# Altium PCB IndoorGuide_Tag_Device_V1.0.0.PcbDoc (part 2 of 2)
Units mil, origin at the board's own origin, x right, y up, seen from the top; angles counter-clockwise.
Board outline 2362.2 x 3661.42 mil, 4 copper layers (Top Layer, Ground, Power, Bottom Layer), stack 62.449 mil thick; 137 components, 86 nets, 438 pads, 206 vias.
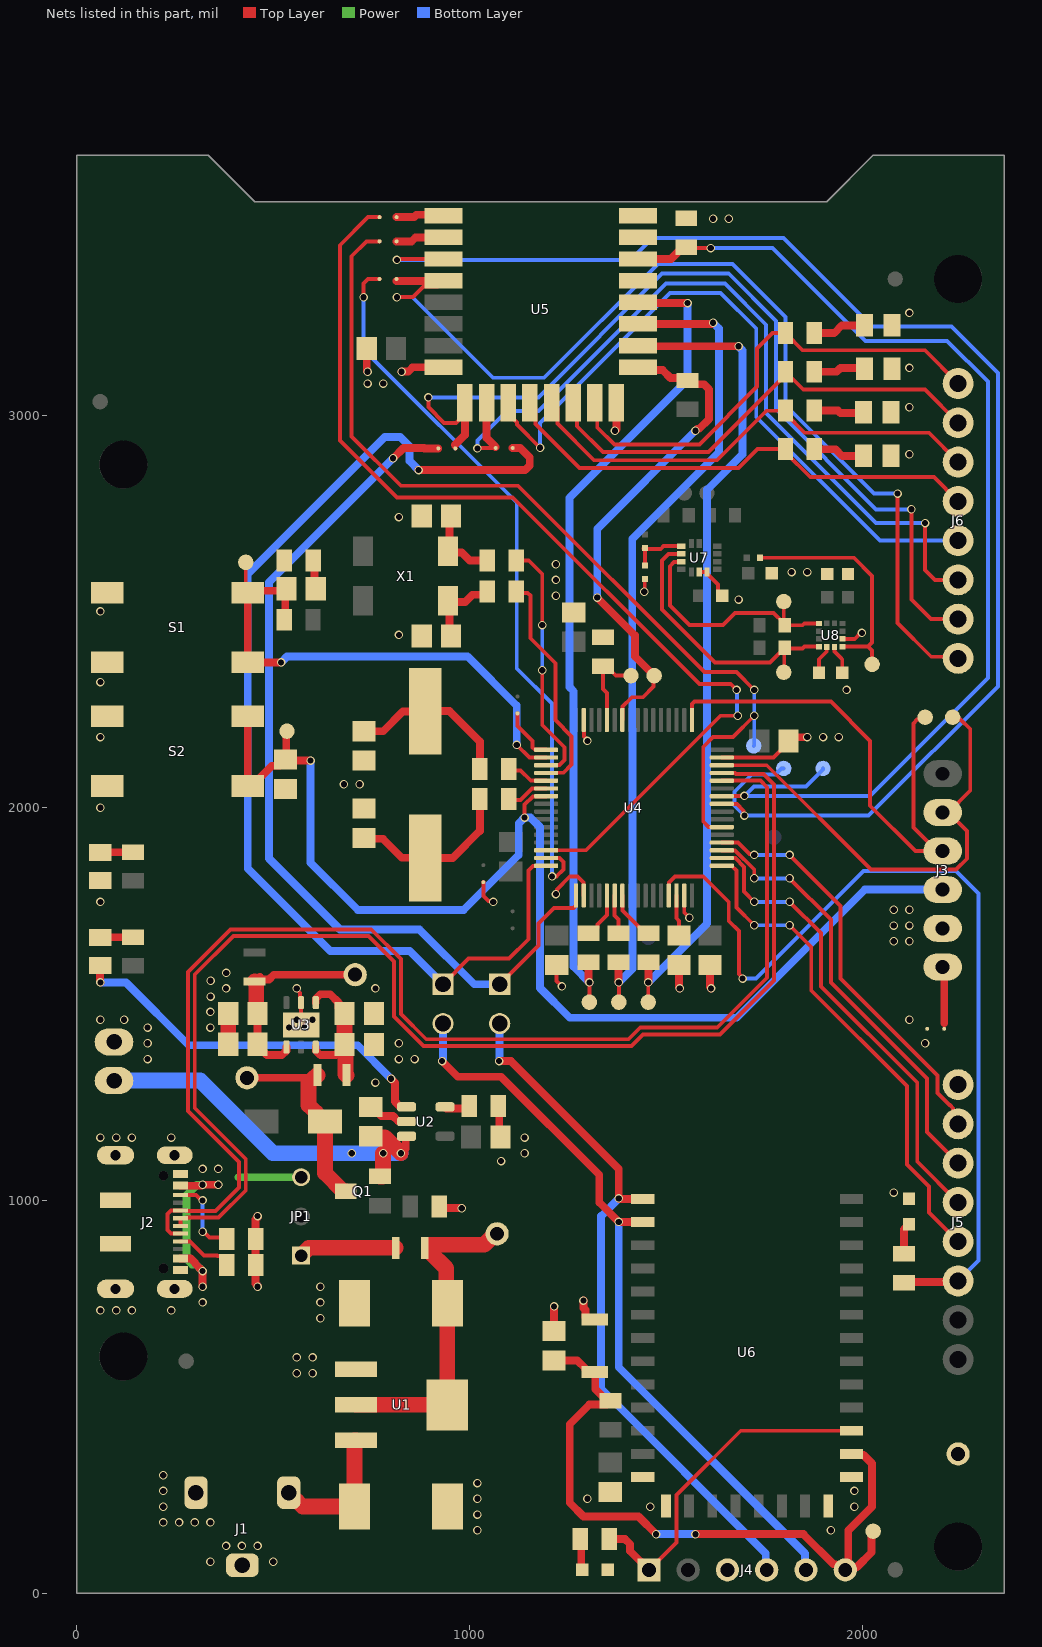
[diagram p4: the nets of this part, all layers, seen from the top]

## Via types
v1: diameter 21.65, hole 15.75, Top Layer to Bottom Layer, tented both sides, 206 vias

## Nets (pads, with @x,y where several pads share a name; then routed paths per layer and width w, separated by ;. In a path a pad name is that pad's centre, name@x,y a point inside that pad or via, vN(x,y) a via of type N, cw(c..) or ccw(c..) an arc to the next point about the centre after c; other vN are vias at no path point) (continued)
BLE_BRK: C23.1 J4.6 R24.1 S3.2 T20.1 U6.23 | length 1794.6
  Top Layer w20: C23.1@1214.65,592.52 1274.18,592.52 1295.43,571.27 1295.43,568.74 1301.18,562.99 S3.2@1318.9,562.99 1318.9,558.35 1320,557.24 1320,519.57 R24.1@1350,489.57 ; R24.1@1358.27,489.57 1348.58,479.88 1304.88,479.88 1255,430 1255,230 1290,195 1430,195 v1(1475,150) ; v1(1575,150) 1850,150 1926.73,73.27 1931.91,73.27 1938.65,66.53 J4.6@1957.49,66.53 ; J4.6@1956.69,59.06 J4.6@1964.17,66.53 ; U6.23@1972.44,354.33 1974.94,351.83 2003.17,351.83 2025,330 2025,220 1964.17,159.17 J4.6@1964.17,66.53 ; T20.1@2027.56,157.48 2023.85,153.77 2023.85,103.85 1986.53,66.53 J4.6@1964.17,66.53
  Bottom Layer w20: v1(1475,150) v1(1575,150)
BLE_RX: JP3.1 SB12.1 U4.16 | length 2857.5
  Top Layer w10: JP3.1@932.29,1550.31 997.69,1615.71 1100.66,1615.71 1150,1665.05 1150,1840 1161.76,1851.76 1194.53,1851.76 U4.16@1195.04,1852.27
  Top Layer w20: v1(870,2860) 1141.51,2860 1153.22,2871.72 1153.22,2891.78 1128.87,2916.13 SB12.1@1109.68,2916.13
  Bottom Layer w20: v1(870,2860) 847.25,2882.75 847.25,2919.96 823.28,2943.93 783.93,2943.93 435,2595 435,1845 645,1635 847.6,1635 JP3.1@932.29,1550.31
BLE_RX_CN: J4.5 JP3.2 U6.2 | length 1901
  Top Layer w20: v1@930.32,1354.68 970,1315 1080,1315 1330,1065 1330,995 v1(1380,945) 1380.12,944.88 U6.2@1440.94,944.88
  Bottom Layer w20: v1(930,1355) 930,1355.45 932.29,1357.74 JP3.2@932.29,1450.31 ; v1(1380,945) 1380,575 1854.23,100.77 1854.23,61.52 J4.5@1856.69,59.06
BLE_STATE: J4.1 R23.1 U6.24 | length 876.9
  Top Layer w10: J4.1@1456.69,59.06 1526.7,129.07 1526.7,249.52 1690.57,413.39 U6.24@1972.44,413.39
  Top Layer w20: R23.1@1355.71,137.8 1395.49,137.8 1408.88,124.4 1408.88,106.87 J4.1@1456.69,59.06
BLE_TX: JP2.1 SB11.1 U4.17 | length 2332.6
  Top Layer w10: JP2.1@1076.59,1550.31 1175,1648.71 1175,1705 1215,1745 1264.94,1745 1271.03,1751.09 U4.17@1271.03,1776.29
  Top Layer w20: v1(805,2890) 805.45,2890 831.58,2916.13 884.47,2916.13 885.6,2915 SB11.1@920.31,2915
  Bottom Layer w20: v1(805,2890) 489.17,2574.17 489.17,1870.83 670,1690 871.99,1690 1011.68,1550.31 JP2.1@1076.59,1550.31
BLE_TX_CN: J4.4 JP2.2 U6.1 | length 1790.5
  Top Layer w20: v1(1075,1355) 1105,1355 1380,1080 v1(1380,1005) 1381.06,1003.94 U6.1@1440.94,1003.94
  Bottom Layer w20: v1(1075,1355) 1075,1355.45 1076.59,1357.04 JP2.2@1076.59,1450.31 ; v1(1380,1005) 1335,960 1335,520 1754.23,100.77 1754.23,61.52 J4.4@1756.69,59.06
BOOT0: R14.2 T19.1 U4.60 | length 221.9
  Top Layer w10: U4.60@1349.77,2223.53 1349.77,2292.5 1339.93,2302.34 R14.2@1339.93,2360.28 1348.19,2360.28 1372.21,2336.26 T19.1@1411.06,2336.26
DEBUG_USB_D_N: J2.5 J2.8 U4.44 | length 3281.7
  Top Layer w10: J2.8@263.78,915.35 263.46,915.67 239.76,915.67 231.09,924.34 231.09,965.42 239.76,974.09 263.46,974.09 J2.5@263.78,974.41 278.15,974.41 279.41,973.15 353.15,973.15 412.84,1032.84 412.84,1097.89 282.84,1227.89 282.84,1582.05 391.18,1690.39 749.61,1690.39 825,1615 825,1475 889.66,1410.34 1404.86,1410.34 1434.52,1440 1630.73,1440 1757.84,1567.11 1757.84,2052.16 1741,2069 1642.48,2069 U4.44@1642.29,2068.81
DEBUG_USB_D_P: J2.6 J2.7 U4.45 | length 3245.3
  Top Layer w10: J2.7@263.78,935.04 J2.6@263.78,954.72 278.15,954.72 279.41,955.99 360.25,955.99 430,1025.73 430,1105 300,1235 300,1574.95 398.28,1673.23 742.5,1673.23 807.84,1607.89 807.84,1467.89 882.56,1393.18 1411.96,1393.18 1441.63,1422.84 1637.84,1422.84 1775,1560 1775,2059.27 1748.11,2086.16 1677.93,2086.16 1676.11,2087.98 1642.8,2087.98 U4.45@1642.29,2088.49
DW_CSn: R18.1 T11.1 U4.58 U5.17 | length 1276.2
  Top Layer w10: U4.58@1389.65,2224.04 1389.65,2257.35 1413.56,2281.26 1441.26,2281.26 1468.66,2308.66 1468.66,2334.8 T11.1@1470.12,2336.26
  Top Layer w20: v1(1325,2535) 1420.87,2439.13 1420.87,2385.51 T11.1@1470.12,2336.26 ; U5.17@1428.94,3121.85 1436.35,3114.44 1491.86,3114.44 1511.68,3094.62 1548.49,3094.62 R18.1@1555.12,3087.99 1564.8,3078.31 1596.69,3078.31 1610,3065 1610,2990 1585,2965 1580.45,2965 1575.45,2960 v1(1575,2960)
  Bottom Layer w20: v1(1325,2535) 1325,2710 v1(1575,2960)
DW_EXTON: SB8.1 U4.14 | length 2597.1
  Top Layer w10: SB8.1@770.66,3503.94 741.57,3503.94 670,3432.37 670,2935 814.92,2790.08 1109.92,2790.08 1585,2315 1665,2315 v1(1680,2300) ; U4.14@1195.04,1891.64 1296.64,1891.64 1639.17,2234.17 v1(1682.67,2234.17)
  Bottom Layer w10: v1(1680,2300) 1681.34,2298.66 1681.34,2235.51 v1(1682.67,2234.17)
DW_GPIO0: J6.1 R19.2 U5.15 | length 1230.1
  Top Layer w10: U5.15@1318.9,3031.5 1325,3025.39 1325,2968.48 1368.48,2925 1585,2925 1732.28,3072.28 1732.28,3169.29 1771.65,3208.66 R19.2@1804.53,3208.66 1848.19,3165 2159.41,3165 J6.1@2244.09,3080.32
DW_GPIO0/RXOKLED: D4.1 R19.1 | length 135.1
  Top Layer w20: R19.1@1878.15,3208.66 1928.35,3208.66 1948.03,3228.35 D4.1@2005.08,3228.35
DW_GPIO1: J6.2 R20.2 U5.14 | length 1205.3
  Top Layer w10: U5.14@1263.78,3031.5 1273.46,3021.81 1273.46,2971.54 1339.33,2905.67 1608.23,2905.67 1804.53,3101.97 R20.2@1804.53,3110.24 1849.76,3065 2159.41,3065 J6.2@2244.09,2980.32
DW_GPIO1/SFDLED: D5.1 R20.1 | length 131.8
  Top Layer w20: R20.1@1878.15,3110.24 1934.61,3110.24 1944.37,3120 2003.02,3120 D5.1@2005.08,3117.94
DW_GPIO2: J6.3 R21.2 U5.13 | length 1230.4
  Top Layer w10: U5.13@1208.66,3031.5 1223.35,3016.81 1223.35,2978.56 1316.91,2885 1630,2885 1756.02,3011.02 1803.73,3011.02 R21.2@1804.53,3011.81 1804.53,3003.54 1853.07,2955 2169.41,2955 J6.3@2244.09,2880.32
DW_GPIO2/RXLED: D6.1 R21.1 | length 128.2
  Top Layer w20: R21.1@1878.15,3011.81 1937.87,3011.81 1944.37,3005.31 2000.53,3005.31 D6.1@2002.76,3007.54
DW_GPIO3: J6.4 R22.2 U5.12 | length 1262.7
  Top Layer w10: U5.12@1153.54,3031.5 1168.23,3016.81 1168.23,2976.77 1280,2865 1685,2865 1733.07,2913.07 R22.2@1804.53,2913.07 1804.53,2904.8 1867.54,2841.79 2182.62,2841.79 J6.4@2244.09,2780.32
DW_GPIO3/TXLED: D7.1 R22.1 | length 132.6
  Top Layer w20: R22.1@1878.15,2913.07 1931.61,2913.07 1949.37,2895.32 2001.25,2895.32 D7.1@2002.76,2896.82
DW_GPIO4: J6.5 U5.11 | length 1805.9
  Top Layer w10: U5.11@1098.43,3031.5 1098.43,3002.95 1120.86,2980.52 1120.86,2975.56 v1(1179.66,2916.75)
  Bottom Layer w10: v1(1179.66,2916.75) 1179.66,2979.66 1510.83,3310.83 1639.17,3310.83 1730,3220 1730,2995 2044.69,2680.32 J6.5@2244.09,2680.32
DW_GPIO5: J6.6 SB12.2 U5.10 | length 2093.3
  Top Layer w10: v1(1020,2915) 1021.13,2916.13 SB12.2@1066.38,2916.13 ; v1(2160,2725) 2160,2605 2184.69,2580.32 J6.6@2244.09,2580.32
  Top Layer w20: U5.10@1043.31,3031.5 1043.31,2941.69 SB12.2@1066.06,2918.94
  Bottom Layer w10: v1(1020,2915) 1020,2935 1095,3010 1175,3010 1500,3335 1650,3335 1755,3230 1755,3005 2035,2725 v1(2160,2725)
DW_GPIO6: J6.7 SB11.2 U5.9 | length 2380.6
  Top Layer w10: v1(895,3045) 895,3020 935,2980 965.24,2980 988.19,3002.95 U5.9@988.19,3031.5 ; 958.94,2921.21 958.94,2919.68 SB11.2@963.62,2915 ; v1(2125,2760) 2125,2530 2174.69,2480.32 J6.7@2244.09,2480.32
  Top Layer w20: 962.92,2924.3 988.19,2949.57 U5.9@988.19,3002.95
  Bottom Layer w10: v1(895,3045) 1175,3045 1490,3360 1660,3360 1780,3240 1780,3015 2035,2760 v1(2125,2760)
DW_GPIO7: J6.8 SB10.2 U5.4 | length 2634.6
  Top Layer w10: 813.97,3341.4 SB10.2@813.97,3346.46 ; v1(815,3300) 815.55,3300.55 855.55,3300.55 882.64,3327.64 918.58,3327.64 932.34,3341.4 U5.4@933.27,3342.32 ; v1(2090,2800) 2090,2470 2175.58,2384.42 2239.99,2384.42 J6.8@2244.09,2380.32
  Top Layer w20: 813.97,3341.4 U5.4@932.34,3341.4
  Bottom Layer w10: v1(815,3300) 855,3300 1060,3095 1190,3095 1480,3385 1670,3385 1805,3250 1805,3025 2030,2800 v1(2090,2800)
DW_GPIO7/SYNC: SB10.1 U4.15 | length 1857
  Top Layer w10: v1(730,3300) 730,3335 741.46,3346.46 SB10.1@770.66,3346.46 ; U4.15@1195.04,1871.95 1195.56,1871.44 1228.86,1871.44 1238.75,1861.55 1238.75,1842.99 1220.76,1825 v1(1210,1825)
  Bottom Layer w10: v1(730,3300) 730,3167 1120,2777 1120,2355 1210,2265 v1(1210,1825)
DW_IRQn: R17.2 T14.1 U4.42 U5.22 | length 2833.5
  Top Layer w10: R17.2@1551.71,3427.76 1554.27,3425.2 v1(1614.17,3425.2) ; U4.42@1642.29,2029.44 1699.44,2029.44 v1(1700,2030)
  Top Layer w20: U5.22@1428.94,3397.44 1513.13,3397.44 1543.44,3427.76 R17.2@1551.71,3427.76
  Bottom Layer w10: v1(1614.17,3425.2) 1771.65,3425.2 2007.87,3188.98 2216.02,3188.98 2320,3085 2320,2330 2020,2030 v1(1700,2030) 1723.81,2053.81 1856.76,2053.81 1900,2097.06 T14.1@1900,2100
DW_MISO: R8.2 T9.1 U5.19 | length 2086.6
  Top Layer w10: T9.1@1380,1505 v1(1380,1555)
  Top Layer w20: R8.2@1379.3,1606.54 1379.3,1555.7 v1(1380,1555) ; U5.19@1428.94,3232.09 1616.64,3232.09 1619.55,3235 v1(1620,3235)
  Bottom Layer w20: v1(1380,1555) 1415,1590 1415,2199.17 1414.17,2200 1414.17,2684.17 1635,2905 1635,3220 v1(1620,3235)
DW_MOSI: R9.2 T10.1 U5.18 | length 2082.3
  Top Layer w10: T10.1@1455,1505 v1(1455,1555)
  Top Layer w20: U5.18@1428.94,3176.97 1430.59,3175.32 1684.68,3175.32 v1(1685,3175) ; v1(1455,1555) 1455.7,1555.7 R9.2@1455.7,1606.54
  Bottom Layer w20: v1(1455,1555) 1605,1705 1605,2810 1695,2900 1695,3164.55 1685,3174.55 v1(1685,3175)
DW_RESETn: T13.1 U4.41 U5.3 | length 3692.3
  Top Layer w10: v1(815,3395) 818.15,3395 820.59,3397.44 U5.3@933.27,3397.44 ; U4.41@1642.29,2009.75 1642.8,2009.24 1680.76,2009.24 1697.77,1992.23 1697.77,1982.23 v1(1700,1980)
  Bottom Layer w10: v1(815,3395) 1410,3395 1466.02,3451.02 1798.98,3451.02 2025,3225 2227.16,3225 2345.21,3106.96 2345.21,2308.96 2016.24,1980 v1(1700,1980) 1674.17,2005.83 1674.17,2040.7 1718.48,2085 1779.46,2085 1794.46,2100 T13.1@1800,2100
DW_SCK: R7.2 T8.1 U5.20 | length 2105.1
  Top Layer w10: T8.1@1305,1505 v1(1305,1555)
  Top Layer w20: R7.2@1302.89,1606.54 1302.89,1557.56 1305,1555.45 v1(1305,1555) ; U5.20@1428.94,3287.2 1430.83,3285.32 1554.68,3285.32 v1(1555,3285)
  Bottom Layer w20: v1(1305,1555) 1265,1595 1265,2296.4 1254.17,2307.23 1254.17,2789.17 1555,3090 v1(1555,3285)
DW_WAKEUP: SB9.1 T18.1 U4.38 | length 2387.9
  Top Layer w10: SB9.1@770.66,3442.35 737.35,3442.35 699.5,3404.5 699.5,2945.5 825,2820 1123.48,2820 1598.32,2345.15 1679.85,2345.15 v1(1725,2300) ; U4.38@1642.29,1950.7 1641.78,1951.21 1608.47,1951.21 1595,1964.68 1595,2155 1620,2180 1670.83,2180 v1(1725,2234.17)
  Bottom Layer w10: T18.1@1723.59,2157.62 1725,2159.02 v1(1725,2234.17) v1(1725,2300)
EXT_5V: JP1.1 SB1.2 | length 249.6
  Top Layer w40: JP1.1@570.87,859.11 590.9,879.15 SB1.2@812.2,879.15
GND: B1.2 C1.2 C2.2 C3.1 C4.1 C5.1 C6.1 C7.1 C8.1 C9.1 C10.1 C11.1 C12.1 C15.1 C16.1 C17.1 C18.1 C19.1 C20.1 C21.2 C22.1 C23.2 C24.2 C25.2 C26.2 C27.2 C28.1 D3.2 D4.2 D5.2 D6.2 D7.2 D8.2 D9.2 J1.2 J1.3 J2.1 J2.12 J2.S1 J2.S2 J2.S3 J2.S4 J2.S5 J2.S6 J3.5 J4.3 J5.8 R2.1 R3.1 R5.1 R6.1 R11.2 R14.1 R17.1 S1.1 S1.4 S2.2 S2.3 S3.1 SB4.1 SB7.1 SB14.2 T24.1 U1.1 U2.2 U3.2 U3.7 U4.18 U4.31 U4.47 U4.63 U5.8 U5.16 U5.21 U5.23 U5.24 U6.13 U6.14 U6.21 U6.22 U7.6 U7.7 U8.6 U8.8 | length 1995.5
  Top Layer w10: v1(560,1540) 560,1536.85 567.99,1528.85 567.99,1506.45 U3.2@570.87,1503.57 U3.7@570.87,1447.08 ; SB7.1@1035,1810.32 1035,1775 1047.77,1762.23 1057.77,1762.23 v1(1060,1760) ; v1(1220,1780) 1222.23,1782.23 1222.23,1792.23 1255,1825 1275.3,1825 1290.2,1810.1 1290.2,1776.8 U4.18@1290.71,1776.29 ; C9.1@1221.82,1599.46 1221.82,1558.87 1235,1545.68 v1(1235,1545) ; U4.63@1290.71,2223.53 1291.22,2223.02 1291.22,2181.93 1300,2173.15 v1(1300,2170) ; v1(1445,2550) 1446,2551 1446,2581.49 SB14.2@1447.01,2582.49 ; U4.31@1546.62,1776.29 1546.62,1733.38 v1(1560,1720) ; U7.6@1584.8,2600.61 U7.7@1604.49,2600.61 1604.49,2596.18 1613.45,2587.22 1613.76,2587.22 1632.95,2568.03 1632.95,2550.12 C26.2@1643.7,2539.37 ; U4.47@1642.29,2127.86 1706.24,2127.86 1706.62,2127.47 1773.81,2127.47 1812.4,2166.06 C11.1@1812.4,2170 C11.1@1817.4,2165 ; U8.6@1929.29,2409.67 1929.29,2397.68 1946.05,2380.92 1948.98,2377.99 C28.1@1948.98,2343.52 ; U8.8@1949.47,2429.84 1980.86,2429.84 1996.02,2445 v1(1999.17,2445)
  Top Layer w20: v1(460,780) 460,783.15 454.88,788.27 R5.1@454.88,835.05 R6.1@454.88,901.46 454.88,951.73 460,956.85 v1(460,960) ; C21.2@738.09,3169.29 738.09,3112.36 v1(740,3110.45) ; C4.1@748.03,1238.19 751.97,1238.19 775.16,1215 804.89,1215 817.29,1202.6 837.71,1202.6 U2.2@839.52,1200.79 ; v1(826.77,3110.24) 827.09,3110.55 843.74,3110.55 855.04,3121.85 U5.8@933.27,3121.85 ; R3.1@922.64,984.25 926.57,980.32 979.68,980.32 v1(980,980) ; R2.1@1072.83,1240.16 1075.52,1237.47 1075.52,1164.1 C3.1@1078.2,1161.42 ; C23.2@1214.65,667.32 1214.65,729.65 v1(1215,730) ; v1(1290,745) 1290.16,744.84 1290.16,726.03 1295.43,720.75 1295.43,702.6 1300.96,697.07 S3.1@1319.12,697.07 ; v1(1370,2960) 1374.02,2964.02 U5.16@1374.02,3031.5 ; C16.1@1533.1,1599.46 1533.1,1542.88 1535,1540.98 v1(1535,1540) ; C10.1@1611.84,1599.46 1611.84,1544.14 1615,1540.98 v1(1615,1540) ; C11.1@1817.4,2165 1827.99,2175.59 1827.99,2179.31 1859.31,2179.31 v1(1860,2180)
  Top Layer w40: C5.1@385.38,1397.78 C6.1@385.38,1476.18
  other v1: 340,80 500,80 380,120 420,120 460,120 1020,160 1920,160 220,180 260,180 300,180 340,180 1020,200 220,220 1460,220 1980,220 1020,240 1300,240 220,260 1980,260 1020,280 220,300 560,560 600,560 560,600 600,600 620,700 60,720 100,720 140,720 240,720 620,740 620,780 2080,1020 1080,1100 1140,1120 60,1160 100,1160 140,1160 240,1160 1140,1160 760,1300 180,1360 820,1360 860,1360 180,1400 820,1400 2160,1400 180,1440 340,1440 540,1440 580,1440 60,1460 120,1460 560,1460 600,1460 2120,1460 340,1480 340.19,1519.17 380,1540 760,1540 340.19,1559.17 380.19,1579.17 2080,1660 2120,1660 2080,1700 2120,1700 2080,1740 2120,1740 60,1760 60,2000 680,2060 720,2060 60,2180 1900,2180 1940,2180 1960,2300 60,2320 820,2440 60,2500 1685,2530 1220,2540 1220,2580 1820,2600 1860,2600 1220,2620 820,2740 2120,2900 2120,3020 740,3080 780,3080 2120,3120 2120,3260 1620,3500 1660,3500
MAG_SCL: R26.1 T22.1 U7.3 U8.1 | length 618.9
  Top Layer w10: U7.3@1539.04,2626.69 1538.24,2625.9 1520.9,2625.9 1510,2615 1510,2515 1560,2465 1645,2465 1675.93,2495.93 1774.05,2495.93 R26.1@1800,2469.98 ; T22.1@1800,2525 1800,2467.23 R26.1@1802.6,2464.63 1847.7,2464.63 1852.49,2469.42 1889.13,2469.42 U8.1@1889.72,2470
MAG_SDA: R27.1 T23.1 U7.2 U8.4 | length 713.7
  Top Layer w10: U7.2@1539.04,2646.38 1506.38,2646.38 1490,2630 1490,2505 1625,2370 1765.32,2370 1789.29,2393.98 1792.05,2393.98 R27.1@1801.34,2403.27 ; T23.1@1800,2345 1801.34,2346.34 R27.1@1801.34,2403.27 ; R27.1@1802.6,2407.28 1801.34,2406.02 R27.1@1801.34,2403.27 ; R27.1@1803.07,2405 1847.52,2405 1852.68,2410.16 U8.4@1889.43,2410.16
MCU_GPIO1: J5.3 R25.2 U4.29 | length 2315.6
  Top Layer w10: U4.29@1507.25,1776.29 1507.76,1776.8 1507.76,1810.1 1522.66,1825 1595,1825 1660,1760 1660,1711.52 1685.83,1685.7 1685.83,1576.68 1695,1567.51 v1(1695,1565)
  Top Layer w20: R25.2@2106.3,789.96 2108.76,792.42 2241.63,792.42 J5.3@2244.09,794.88
  Bottom Layer w10: v1(1695,1565) 1728.84,1565 2002.62,1838.79 2239.14,1838.79 2296.46,1781.46 2296.46,847.25 J5.3@2244.09,794.88
MCU_GPIO2: J5.4 U4.33 | length 1274.1
  Top Layer w10: U4.33@1642.29,1852.27 1667.48,1852.27 1680,1839.75 1680,1745.65 v1(1725,1700.65) ; v1(1815,1700.65) 1870,1645.65 1870,1535 2113.58,1291.42 2113.58,1091.42 2170,1035 2170,968.98 J5.4@2244.09,894.88
  Bottom Layer w10: v1(1725,1700.65) v1(1815,1700.65)
MCU_GPIO3: J5.5 U4.34 | length 1198.9
  Top Layer w10: U4.34@1642.29,1871.95 1642.8,1871.44 1676.7,1871.44 1699.17,1848.97 1699.17,1786.26 v1(1725,1760.43) ; v1(1815,1760.43) 1894.78,1680.65 1894.78,1545.22 2140,1300 2140,1098.98 J5.5@2244.09,994.88
  Bottom Layer w10: v1(1725,1760.43) v1(1815,1760.43)
MCU_GPIO4: J5.6 U4.35 | length 1118.3
  Top Layer w10: U4.35@1642.29,1891.64 1642.8,1891.13 1676.11,1891.13 1725,1842.23 v1(1725,1820.22) ; v1(1815,1820.22) 1920,1715.22 1920,1555 2165,1310 2165,1173.98 J5.6@2244.09,1094.88
  Bottom Layer w10: v1(1725,1820.22) v1(1815,1820.22)
MCU_GPIO5: J5.7 U4.36 | length 1049
  Top Layer w10: U4.36@1642.29,1911.33 1683.47,1911.33 1712.56,1882.23 1722.77,1882.23 v1(1725,1880) ; v1(1815,1880) 1945,1750 1945,1565 2191.72,1318.28 2191.72,1273.19 2222.4,1242.51 2223.12,1242.51 2230.94,1234.69 2230.94,1208.03 J5.7@2244.09,1194.88
  Bottom Layer w10: v1(1725,1880) v1(1815,1880)
MDRDY: SB15.2 T21.1 U8.7 | length 603.7
  Top Layer w10: SB15.2@1739.61,2636.57 1978.43,2636.57 2025,2590 2025,2420.32 2014.84,2410.16 ; U8.7@1949.63,2410 U8.7@1949.47,2410.16 1958.27,2410.16 2014.84,2410.16 ; T21.1@2025,2365 2025,2400 2014.84,2410.16
NetB1_1: B1.1 C4.2 Q1.2 U2.3 | length 1017.5
  Top Layer w20: v1(825,1120) 837.3,1132.3 837.3,1161.57 837.71,1161.57 U2.3@839.52,1163.39
  Top Layer w40: C4.2@748.03,1161.18 750.24,1161.18 750.59,1160.83 784.17,1160.83 v1(825,1120) ; Q1.2@771.65,1061.02 778.9,1061.02 779.21,1061.34 779.21,1119.21 v1(780,1120)
  Bottom Layer w40: B1.1@94.49,1305.12 314.25,1305.12 499.37,1120 v1(700,1120) v1(780,1120) v1(825,1120)
NetC1_1: C1.1 J1.1 U1.3 | length 361.2
  Top Layer w40: J1.1@539.37,255.91 539.37,244.09 548.9,234.57 560.71,234.57 574.84,220.43 C1.1@707.13,220.43 707.13,388.59 707.44,388.91 U1.3@710.63,388.91
NetC2_1: C2.1 SB1.1 T1.1 U1.2 U1.4 | length 845.3
  Top Layer w40: U1.2@710.63,479.46 U1.4@942.91,479.46 943.13,479.68 943.13,738.27 C2.1@943.35,738.48 940.24,741.59 940.24,826.94 895.98,871.2 895.98,887.1 1037.04,887.1 1064.94,915 T1.1@1070,915
NetC5_2: C5.2 C6.2 SB3.1 T3.1 U3.4 | length 531.8
  Top Layer w20: SB3.1@452.76,1557.68 454.84,1557.68 465.65,1568.49 466.47,1568.49 472.47,1562.49 489.04,1562.49 501.36,1574.8 T3.1@708.66,1574.8 ; C6.2@460.18,1476.18 C5.2@460.18,1397.78 460.18,1393.84 484.02,1370 521.75,1370 533.46,1381.72 U3.4@533.46,1390.58
  Top Layer w40: SB3.1@452.76,1557.68 456.47,1553.97 456.47,1479.9 C6.2@460.18,1476.18
NetC14_2: C14.2 R11.1 | length 75.2
  Top Layer w20: R11.1@601.81,2630 605.04,2626.77 605.04,2560.71 C14.2@608.27,2557.48
NetC16_2: C16.2 U4.30 | length 105
  Top Layer w10: U4.30@1526.93,1776.29 1526.42,1775.77 1526.42,1718.58 1533.1,1711.9 C16.2@1533.1,1674.26
NetC17_2: C17.2 R13.1 X1.1 | length 202.9
  Top Layer w20: C17.2@952.95,2742.55 949.02,2738.62 949.02,2657.01 X1.1@945.08,2653.07 948.15,2650 980,2650 1000.55,2629.45 R13.1@1045.44,2629.45
NetC18_2: C18.2 R12.2 X1.4 | length 200.6
  Top Layer w20: X1.4@945.08,2527.09 X1.4@949.02,2523.15 ; C18.2@952.95,2437.6 949.02,2441.54 X1.4@949.02,2523.15 ; R12.2@1045.44,2550.71 1037.19,2542.47 1007.47,2542.47 988.95,2523.95 949.82,2523.95 X1.4@949.02,2523.15
NetC19_2: C19.2 R15.2 X2.1 | length 425.5
  Top Layer w20: C19.2@731.3,1923.14 733.55,1920.89 779.11,1920.89 827.55,1872.45 886.67,1872.45 X2.1@887.17,1871.95 956.95,1871.95 1026.18,1941.18 R15.2@1026.18,2021.93
NetC20_2: C20.2 R16.2 X2.2 | length 418.5
  Top Layer w20: C20.2@731.3,2194.79 779.79,2194.79 830,2245 886.2,2245 X2.2@887.17,2245.97 949.03,2245.97 1026.18,2168.82 R16.2@1026.18,2098.33
NetC28_2: C28.2 U8.5 | length 74.3
  Top Layer w10: C28.2@1889.92,2343.52 1890,2343.6 1890,2378.07 1909.61,2397.68 U8.5@1909.61,2409.67
NetD1_2: D1.2 Q1.3 SB2.1 T2.1 | length 528
  Top Layer w20: T2.1@433.07,1312.24 603.93,1312.24 SB2.1@610.59,1318.9
  Top Layer w40: SB2.1@603.93,1312.24 590,1298.31 590,1242.68 608.58,1224.09 608.58,1211.3 619.09,1200.79 D1.2@631.89,1200.79 631.89,1069.53 677.8,1023.62 Q1.3@685.04,1023.62 ; SB2.1@610.59,1318.9 SB2.1@612.8,1318.9
NetD2_1: D2.1 R1.1 | length 84.1
  Top Layer w20: D2.1@59.06,1669.29 59.74,1669.98 141.93,1669.98 R1.1@142.62,1670.67
NetD2_2: D2.2 U2.1 | length 982.9
  Top Layer w20: D2.2@59.06,1598.43 59.06,1555.94 v1(60,1555) ; v1(800,1310) 800,1309.55 810,1299.55 810,1251.72 821.72,1240 837.71,1240 U2.1@839.52,1238.19
  Bottom Layer w20: v1(60,1555) 125,1555 285,1395 715,1395 v1(800,1310)
NetD3_1: D3.1 R4.1 | length 84.1
  Top Layer w20: D3.1@59.06,1885.83 59.74,1886.52 141.93,1886.52 R4.1@142.62,1887.2
NetD8_1: D8.1 R23.2 | length 80.5
  Top Layer w20: R23.2@1282.09,137.8 1284.25,135.63 1284.25,61.22 D8.1@1286.42,59.06
NetD9_1: D9.1 R25.1 | length 80.7
  Top Layer w20: R25.1@2106.3,863.58 2106.3,926.22 D9.1@2119.05,938.98
NetJ2_3: J2.3 R6.2 | length 210.9
  Top Layer w10: J2.3@263.78,1013.78 303.07,1013.78 316.85,1000 v1(320,1000) ; v1(320,920) 323.15,920 338.15,905 377.72,905 R6.2@381.26,901.46
  Bottom Layer w10: v1(320,920) v1(320,1000)
NetJ2_9: J2.9 R5.2 | length 147.4
  Top Layer w10: J2.9@263.78,895.67 264.09,895.35 288.12,895.35 323.48,860 356.31,860 358.31,858.01 366.57,858.01 381.26,843.32 R5.2@381.26,835.05
NetJ3_6: J3.6 SB4.2 | length 144.1
  Top Layer w20: J3.6@2204.72,1594.49 2208.66,1590.55 2208.66,1452
NetR2_2: R2.2 U2.5 | length 95
  Top Layer w20: R2.2@999.21,1240.16 999.21,1239.13 1004.17,1234.17 U2.5@954.53,1234.17 ; U2.5@941.57,1234.17 U2.5@937.55,1238.19 U2.5@941.57,1234.17 ; U2.5@941.57,1234.17 U2.5@954.53,1234.17 ; U2.5@941.57,1234.17 U2.5@954.53,1234.17
NetR7_1: R7.1 U4.21 | length 120.4
  Top Layer w10: R7.1@1302.89,1680.17 1311.16,1680.17 1325.84,1694.85 1325.84,1703.12 1349.77,1727.04 U4.21@1349.77,1776.29
NetR8_1: R8.1 U4.22 | length 100.2
  Top Layer w10: U4.22@1369.45,1776.29 1369.45,1725.55 1379.3,1715.7 R8.1@1379.3,1680.17
NetR9_1: R9.1 U4.23 | length 128.5
  Top Layer w10: U4.23@1389.14,1776.29 1389.14,1751.09 1389.65,1750.58 1389.65,1737.95 1447.43,1680.17 R9.1@1455.7,1680.17
NetR12_1: R12.1 U4.4 | length 587.7
  Top Layer w10: R12.1@1119.06,2550.71 1122.65,2547.12 1147.88,2547.12 1155,2540 1155,2431.52 1218.66,2367.87 1218.66,2222.91 1260,2181.57 1260,2110 1239,2089 1195.56,2089 U4.4@1195.04,2088.49
NetR13_2: R13.2 U4.3 | length 629.2
  Top Layer w10: R13.2@1119.06,2629.45 1150.55,2629.45 1185,2595 v1(1185,2465) ; v1(1185,2350) 1185,2210.58 1241.5,2154.08 1241.5,2121.33 1228.86,2108.69 1195.56,2108.69 U4.3@1195.04,2108.18
  Bottom Layer w10: v1(1185,2350) v1(1185,2465)
NetR15_1: R15.1 U4.6 | length 108.1
  Top Layer w10: R15.1@1099.81,2021.93 1101.73,2020 1130,2020 1158.61,2048.61 1194.53,2048.61 U4.6@1195.04,2049.12
NetR16_1: R16.1 U4.5 | length 107.5
  Top Layer w10: R16.1@1099.81,2098.33 1103.14,2095 1130,2095 1155.68,2069.32 1194.53,2069.32 U4.5@1195.04,2068.81
NetSB5_2: SB5.2 U4.1 | length 139.6
  Top Layer w10: SB5.2@1122.05,2240.16 1122.05,2207.95 1160,2170 1160,2153.92 1165.86,2148.06 1194.53,2148.06 U4.1@1195.04,2147.55
NetSB8_2: SB8.2 U5.1 | length 122.8
  Top Layer w20: SB8.2@813.97,3503.94 858.94,3503.94 865,3510 930.95,3510 U5.1@933.27,3507.68
NetSB9_2: SB9.2 U5.2 | length 123.5
  Top Layer w20: SB9.2@813.97,3442.35 852.35,3442.35 862.56,3452.56 U5.2@933.27,3452.56
NetSB13_2: SB13.2 SB14.1 U7.1 | length 144.9
  Top Layer w10: SB13.2@1442.82,2660.41 1444.33,2658.9 SB13.2@1447.01,2658.9 ; SB14.1@1447.01,2616.51 SB13.2@1447.01,2658.9 ; SB13.2@1447.01,2661.57 SB13.2@1447.01,2658.9 ; U7.1@1539.04,2666.06 1493.88,2666.06 1486.71,2658.9 SB13.2@1447.01,2658.9
NRST: C15.2 J3.4 S2.1 S2.4 T17.1 U4.7 | length 3188.8
  Top Layer w10: C15.2@531.5,2122.44 C15.2@533.94,2120 ; v1(1140,1975) 1140,2007.7 1161.23,2028.92 1194.53,2028.92 U4.7@1195.04,2029.44
  Top Layer w20: S2.4@435.04,2232.68 S2.1@435.04,2055.51 448.82,2055.51 466.38,2073.07 466.38,2076.38 496.85,2106.85 515.91,2106.85 C15.2@531.5,2122.44 533.25,2124.19 533.25,2193.25 T17.1@535,2195 ; C15.2@533.94,2120 v1(595,2120)
  Bottom Layer w20: v1(595,2120) 595,1860 715,1740 985,1740 1125,1880 1125,1960 v1(1140,1975) 1140.32,1974.68 1155.32,1974.68 1179.17,1950.83 1179.17,1540.84 1255.01,1465 1680,1465 2006.34,1791.34 J3.4@2204.72,1791.34
SWCLK: J3.3 T5.1 U4.49 | length 1321.8
  Top Layer w10: U4.49@1566.3,2223.53 1566.82,2224.04 1566.82,2264.14 1572.67,2270 1920,2270 2020,2170 2020,2005 2135.24,1889.76 J3.3@2189.96,1889.76 ; T5.1@2160,2230.39 2154.38,2224.77 2139.77,2224.77 2130,2215 2130,1949.72 J3.3@2189.96,1889.76 ; J3.3@2204.72,1889.76 J3.3@2189.96,1889.76
SWDIO: J3.2 T4.1 U4.46 | length 1191.2
  Top Layer w10: U4.46@1642.29,2108.18 1756.82,2108.18 2022.68,1842.32 2239.14,1842.32 2266.94,1870.11 2266.94,1940.74 J3.2@2219.49,1988.19 ; J3.2@2204.72,1988.19 J3.2@2219.49,1988.19 ; T4.1@2230,2230.39 2235.62,2224.77 2250.23,2224.77 2275,2200 2275,2043.7 J3.2@2219.49,1988.19
USB_5V: J2.2 J2.11 JP1.3 | length 636.5
  Top Layer w20: J2.11@263.78,852.36 264.02,852.13 289.87,852.13 301.46,840.53 301.46,838.54 v1(320,820) ; J2.2@263.78,1037.4 316.95,1037.4 319.55,1040 v1(360,1040) ; v1(320,780) v1@320,820.45
  Power w20: v1(320,820) 319.55,820 302.64,836.91 293.32,836.91 279.17,851.05 279.17,1012.77 306.09,1039.68 319.68,1039.68 v1(320,1040) ; v1(360,1040) v1@360.32,1040.32 ; 410.83,1059.11 JP1.3@570.87,1059.11
  other v1: 320,740 320,1080 360,1080
USER_BUTTON: C14.1 R10.1 S1.2 S1.3 T12.1 U4.2 | length 1367.6
  Top Layer w10: T12.1@430,2625 430,2552.68 S1.2@435.04,2547.64 ; S1.3@435.04,2370.47 S1.3@435.51,2370 ; v1(1120,2160) 1152.14,2127.86 U4.2@1195.04,2127.86
  Top Layer w20: S1.3@435.04,2370.47 S1.2@435.04,2547.64 439.96,2552.56 528.54,2552.56 C14.1@530.51,2554.53 ; S1.3@435.51,2370 v1(520,2370) ; R10.1@527.56,2478.74 530.51,2481.69 C14.1@530.51,2554.53 ; C14.1@533.46,2557.48 C14.1@530.51,2554.53
  Bottom Layer w20: v1(520,2370) 535,2385 995,2385 1120,2260 v1(1120,2160)
VIN_3V3: C7.2 C8.2 SB2.2 U3.1 U3.6 | length 375.2
  Top Layer w20: U3.6@608.27,1390.58 608.27,1381.72 619.98,1370 658.19,1370 681.55,1393.36 C8.2@681.55,1397.3 ; U3.1@608.27,1503.57 608.27,1513.28 619.98,1525 645.04,1525 665.96,1504.08 665.96,1491.3 C7.2@681.55,1475.71
  Top Layer w40: C7.2@681.55,1475.71 C8.2@681.55,1397.3 683.99,1394.87 683.99,1377.77 683.99,1321.33 SB2.2@686.42,1318.9
pads on no net: FM1.0 FM2.0 FM3.0 FM4.0 J2. J2.4 J2.10 MH1.1 MH2.1 MH3.1 MH4.1 U3.3 U3.5 U4.8 U4.9 U4.10 U4.11 U4.20 U4.24 U4.26 U4.27 U4.28 U4.39 U4.40 U4.43 U4.50 U4.51 U4.52 U4.53 U4.54 U4.55 U4.56 U4.57 U4.59 U6.3 U6.4 U6.5 U6.6 U6.7 U6.8 U6.9 U6.10 U6.11 U6.15 U6.16 U6.17 U6.18 U6.19 U6.20 U6.25 U6.26 U6.27 U6.28 U6.29 U6.30 U6.31 U6.32 U6.33 U6.34 U7.10 U7.11 U8.2 U8.11 U8.12 X1.2 X1.3

## Polygon pours and split planes (outlines as drawn)
+3V3 on Power "+3V3_L03_P003" (solid, pour order 3): 2090,2350 2090,2355 2090,2550 1800,2840 1580,3060 1080,3060 855,3285 630,3285 565,3220 565,2275 160,1870 160,1280 225,1215 980,460 980,20 2320,20 2320,2120
GND on Bottom Layer "GND_L04_P002" (solid, remove dead copper, pour order 2): 0,0 0,3160 360,3160 740,3540 1900,3540 2200,3240 2360,3240 2360,0 2100,0
GND on Top Layer "GND_L01_P001" (solid, remove dead copper, pour order 1): 0,0 0,3160 360,3160 740,3540 1900,3540 2200,3240 2360,3240 2360,0 2260,0
GND on Ground "GND_L02_P000" (solid, pour order 0): 0,3160 360,3160 720,3520 1560,3520 1900,3520 2180,3240 2360,3240 2360,0 0,0 0,60

## Keep-outs
Keep-Out Layer:
  rectangle: 0,3543.31 2362.2,3956.69

## Other copper
Top Layer:
  region net NetC5_2: 530,1365 540,1375 540,1405 495,1405 485,1415 485,1560 475,1570 470,1570 455,1585 430,1560 430,1530 435,1525 435,1385 455,1365
  region net VIN_3V3: 620,1365 655,1330 705,1330 705,1505 695,1505 665,1535 600,1535 600,1490 650,1490 660,1480 660,1420 645,1405 600,1405 600,1380 615,1365
  region net NetB1_1: 805,1095 830,1095 860,1125 860,1170 855,1175 795,1175 780,1190 720,1190 715,1185 715,1165 695,1145 675,1145 670,1140 670,1110 680,1100 730,1100 745,1085 745,1045 795,1045 795,1085
  region net NetD1_2: 710,1005 655,1005 655,1020 605,1070 605,1145 565,1185 565,1350 615,1350 645,1320 625,1300 625,1282 680,1227 680,1175 660,1155 660,1100 710,1050
  region net +5V: 970,1190 1025,1190 1025,1090 980,1045 910,1045 870,1005 870,950 850,930 560,930 445,1045 445,1160 435,1170 435,1190 505,1190 505,1075 530,1050 590,990 785,990 820,1025 820,1045 880,1105 945,1105 960,1120 960,1150 955,1155 925,1155 925,1175 955,1175
  region net EXT_5V: 790,900 795,905 800,905 800,855 640,855 605,820 550,820 535,835 535,885 550,900
  region net NetC2_1: 755,445 740,460 740,490 755,505 885,505 895,515 895,545 905,555 905,835 885,855 885,905 985,905 985,820 985,680 975,670 975,565 985,555 985,430 895,430 895,445
  region net NetC1_1: 490,310 490,210 520,180 660,180 670,170 680,170 680,270 740,270 760,290 760,390 660,390 660,350 640,330 510,330
  region net USB_5V: 330,725 335,730 335,825 330,830 300,860 285,860 285,850 300,835 300,810 307,803 307,728 310,725
  region net USB_5V: 375,1100 379,1096 379,1039 369,1029 295,1029 295,1045 305,1055 305,1095 310,1100
Power:
  region net USB_5V: 385,1040 370,1025 300,1025 290,1015 290,870 365,795 365,745 350,730 320,730 309,741 309,788 245,852 245,1035 305,1095 590,1095 604.92,1080.08 605.06,1035.58 594.5,1025 550,1025 535,1040

## Silkscreen, mask and mechanical layers (free items; w line width, h text height)
Top Overlay:
  drawing of 20 lines, arcs and shapes, not listed
  text "REV 1.0.0" at 384,3333 h30 r90
  text "DWM GPIO" at 2180,2829.77 h60 r90
  text "USR-BTN" at 37,2597 h60
  text "RESET" at 37,2269 h60
  text "PWR" at 256,1797 h60 r90
  text "STAT" at 257,1577 h60 r90
  text "SWD" at 2056,1494.77 h60 r90
  text "RX" at 1024,1332 h60
  text "TX" at 880,1331 h60
  text "+    --" at 309.2,1250.5 h60 r90
  text "STM GPIO" at 2179,1044.77 h60 r90
  text "> J2" at 388.5,1035 h60
  text "> J1" at 632.59,841 h60
  text "USB" at 352,839.09 h60 r90
  text "12V-PWR" at 314,443 h60
Bottom Overlay:
  text "DW IO0" at 2175,3051 h60
  text "DW IO1" at 2175,2950.43 h60
  text "DW IO2" at 2175,2849.86 h60
  text "DW IO3" at 2175,2749.29 h60
  text "DW IO4" at 2108,2678 h60
  text "DW IO5" at 2175,2548.14 h60
  text "DW IO6" at 2175,2447.57 h60
  text "DW IO7" at 2175,2347 h60
  text "3V3" at 2130,2060 h60
  text "SWDIO" at 2130,1960 h60
  text "SWCLK" at 2130,1863 h60
  text "RESET" at 2127,1765 h60
  text "GND" at 2130,1660 h60
  text "GND" at 2130,1560 h60
  text "GND" at 2177,1268 h60
  text "IO5" at 2175,1166 h60
  text "IO4" at 2175,1064.75 h60
  text "IO3" at 2175,963.5 h60
  text "IO2" at 2175,862.25 h60
  text "IO1" at 2175,761 h60
  text "3V3" at 2175,666 h60
  text "3V3" at 2175,564 h60
  text "State" at 1430,111.42 h60 r270
  text "3V3" at 1530,111.42 h60 r270
  text "Gnd" at 1630,111.42 h60 r270
  text "Tx" at 1730,111.42 h60 r270
  text "Rx" at 1820,111.42 h60 r270
  text "BRK" at 1920,111.42 h60 r270
Board Shape:
  lines w4: 0,0 2362.2,0 2362.2,3543.31 2362.2,3661.42 2288.39,3661.42 2180.12,3661.42 2145.67,3661.42 2027.56,3661.42 1909.45,3543.31 452.76,3543.31 334.65,3661.42 216.54,3661.42 182.09,3661.42 73.82,3661.42 0,3661.42 0,3543.31 0,1811.02 0,0
Drill Drawing:
  text "UWB Antenna Keepout" at 1447.01,3983.35 h50

## Dimensions
0,3917.32 to 0,3661.42 on Drill Drawing
0,0 to 0,3661.42 on Drill Drawing
0,0 to 2362.2,0 on Drill Drawing